# Altium PCB TIE2019_rezolvare.PcbDoc (part 2 of 2)
Units mm, origin at the board's own origin, x right, y up, seen from the top; angles counter-clockwise.
Board outline 267 x 129 mm, 8 copper layers (Signal 1, GND/Signal 2, GND 3, Signal 4, GND, Power/Signal 6, GND 7, Signal 8), stack 1.597 mm thick; 97 components, 82 nets, 657 pads, 352 vias.
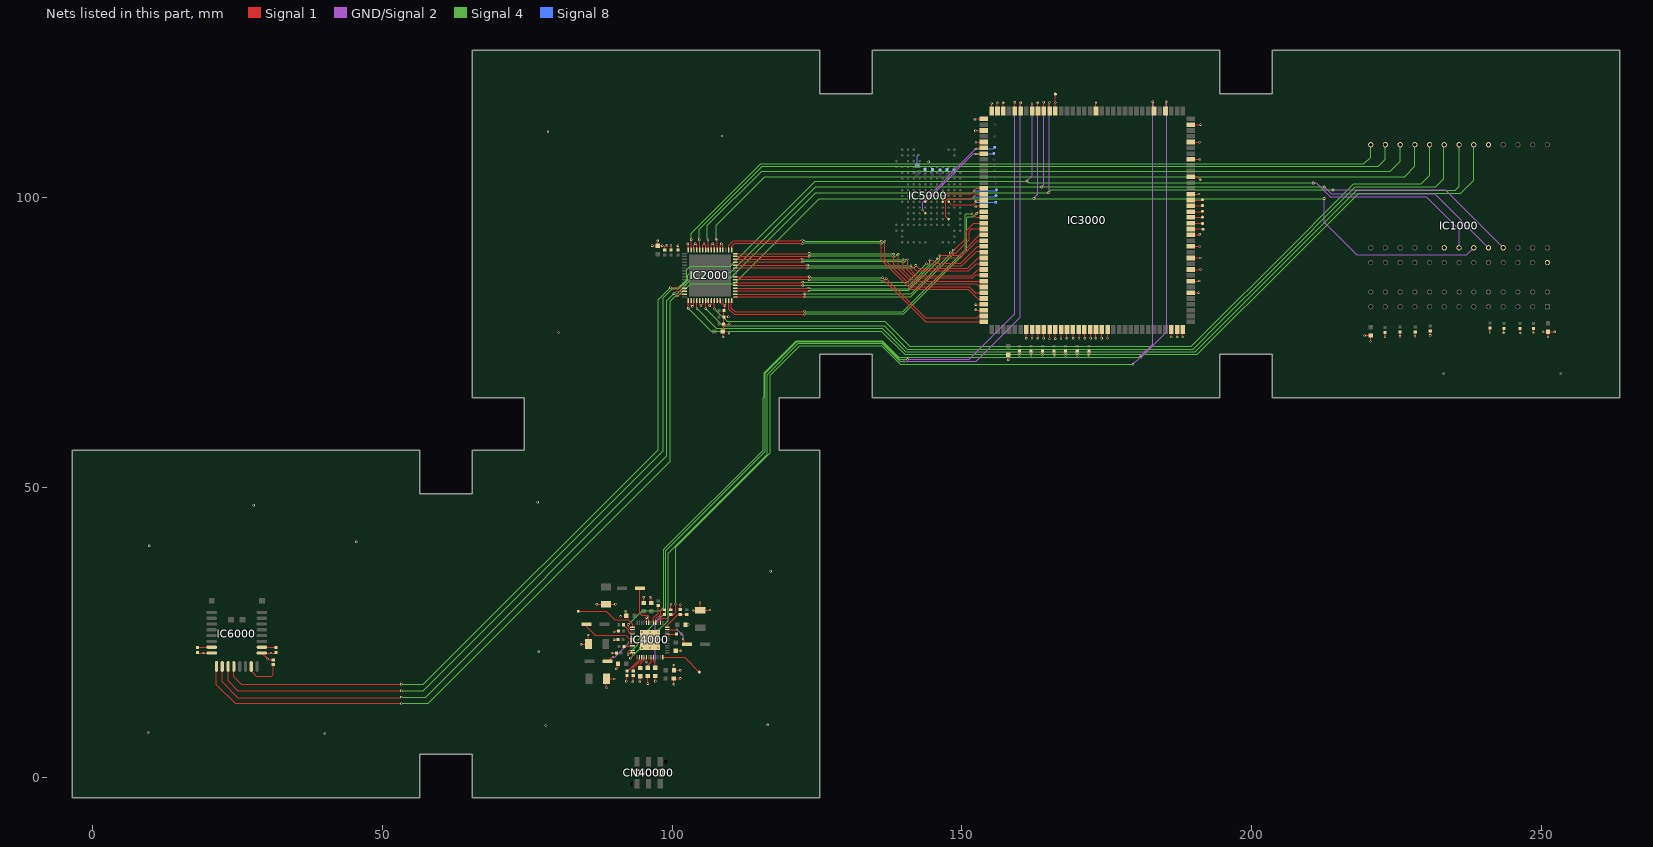
[diagram p8: the nets of this part, all layers, seen from the top]

## Via types
v1: diameter 0.4, hole 0.2, Signal 1 to Signal 8, 276 vias
v2: diameter 0.6, hole 0.3, Signal 1 to Signal 8, 49 vias
v3: diameter 0.325, hole 0.125, Signal 1 to GND/Signal 2, 9 vias
v4: diameter 0.5, hole 0.2, GND/Signal 2 to GND 7, 9 vias
v5: diameter 0.4, hole 0.2, Signal 1 to Signal 8, tented both sides, 9 vias

## Nets (pads, with @x,y where several pads share a name; then routed paths per layer and width w, separated by ;. In a path a pad name is that pad's centre, name@x,y a point inside that pad or via, vN(x,y) a via of type N, cw(c..) or ccw(c..) an arc to the next point about the centre after c; other vN are vias at no path point) (continued)
eMMC_DATA5: IC3000.83 IC5000.K8 TP_D5.1 | length 12.4
  Signal 1 w0.09: IC5000.K8@146.7,99.35 147.125,99.775 147.125,100.5 147.35,100.725 151.625,100.725 152.12,101.22 v1@152.123,101.223 ; v1(152.095,101.25) v1@152.123,101.223 ; IC3000.83@153.775,101.65 152.55,101.65 v1@152.123,101.223
  Signal 8 w0.09: v1(152.095,101.25) 152.095,101.244 155.778,101.244 TP_D5.1@155.931,101.397
eMMC_DATA6: IC3000.84 IC5000.N9 TP_D6.1 | length 14.2
  Signal 1 w0.09: IC5000.N9@147.7,96.35 147.25,96.8 147.25,99.55 147.525,99.825 151.65,99.825 152.475,100.65 IC3000.84@153.775,100.65
  Signal 8 w0.09: v1(152.07,100.254) 155.727,100.254 TP_D6.1@155.88,100.406
eMMC_DATA7: IC3000.85 IC5000.K9 TP_D7.1 | length 10.4
  Signal 1 w0.09: IC5000.K9@147.7,99.35 148.2,98.85 152.025,98.85 152.4,99.225 152.4,99.263 v1@152.493,99.357 ; v1(152.4,99.45) v1@152.493,99.357 ; IC3000.85@153.775,99.65 152.787,99.65 v1@152.493,99.357
  Signal 8 w0.09: v1(152.4,99.45) 152.4,99.263 TP_D7.1@155.829,99.263
eMMC_DS: IC3000.77 IC5000.K5 TP_DS.1 | length 16.6
  Signal 1 w0.09: IC5000.K5@143.7,99.35 v3(144.15,99.8) ; v1@152.35,107.6 152.4,107.65 IC3000.77@153.775,107.65
  GND/Signal 2 w0.09: v3(144.15,99.8) 151.95,107.6 v1@152.35,107.6
  Signal 8 w0.09: v1(152.4,107.594) 155.423,107.594 TP_DS.1@155.499,107.671
eMMC_RST: IC3000.76 IC5000.M5 TP_RST.1 | length 20
  Signal 1 w0.09: v3(143.2,97.9) 143.2,97.85 IC5000.M5@143.7,97.35 ; v1@152.4,108.5 152.55,108.65 IC3000.76@153.775,108.65
  GND/Signal 2 w0.09: v3(143.2,97.9) 143.2,99.3 v1@152.4,108.5
  Signal 8 w0.09: v1(152.4,108.458) 155.372,108.458 TP_RST.1@155.651,108.737
FRAME_CLK_N: IC2000.24 IC3000.106 | length 46.3
  Signal 1 w0.2: IC2000.24@110.899,86.415 110.934,86.38 110.954,86.4 123.33,86.4 123.43,86.5 123.65,86.5 v1(123.65,86.4) ; v1(136.3,86.235) 136.52,86.015 136.52,85.922 143.772,78.67 153.755,78.67 IC3000.106@153.775,78.65
  Signal 4 w0.09: v1(123.65,86.4) 123.675,86.375 123.847,86.375 123.987,86.235 v1(136.3,86.235)
FRAME_CLK_P: IC2000.23 IC3000.105 | length 46.1
  Signal 1 w0.2: IC2000.23@110.899,85.915 110.934,85.95 111.113,85.95 111.123,85.96 111.388,85.96 111.398,85.97 123.33,85.97 123.43,85.87 123.65,85.87 v1(123.65,85.9) ; v1(136.95,86.1) 143.7,79.35 152.625,79.35 152.925,79.65 IC3000.105@153.775,79.65
  Signal 4 w0.09: v1(123.65,85.9) 123.675,85.925 123.844,85.925 123.854,85.915 135.948,85.915 136.103,85.76 136.497,85.76 136.775,86.038 136.775,86.1 v1(136.95,86.1)
GND: C1001.1 C1002.1 C1003.1 C1004.1 C1005.1 C1101.1 C1102.1 C1103.1 C1104.1 C1105.1 C2001.1 C2002.1 C2003.1 C2004.1 C2101.1 C2102.1 C2103.1 C2104.1 C3000.2 C3001.2 C3002.2 C3003.2 C3004.2 C3005.2 C3006.2 C3007.2 C4001.1 C4002.1 C4003.1 C4004.2 C4005.2 C4006.1 C4007.1 C4008.1 C4009.1 C4010.2 C4011.1 C4012.2 C4013.1 C4014.2 C4015.1 C4016.2 C4017.1 C4019.1 C5001.2 C5002.2 C5003.2 C5004.1 C5005.1 C5006.1 C6001.1 C6002.1 C6003.1 CN40000.1 CN40000.3 IC1000.D1 IC1000.E8 IC1000.M5 IC2000.2 IC2000.3 IC2000.5 IC2000.6 IC2000.8 IC2000.9 IC2000.11 IC2000.12 IC2000.14 IC2000.36 IC2000.37 IC2000.39 IC2000.40 IC2000.42 IC2000.43 IC2000.45 IC2000.46 IC2000.48 IC3000.6 IC3000.8 IC3000.10 IC3000.12 IC3000.14 IC3000.16 IC3000.23 IC3000.26 IC3000.29 IC3000.32 IC3000.35 IC3000.52 IC3000.59 IC3000.68 IC3000.69 IC3000.70 IC3000.71 IC3000.73 IC3000.75 IC3000.86 IC3000.103 IC3000.104 IC3000.113 IC3000.114 IC3000.115 IC3000.116 IC3000.117 IC3000.118 IC3000.119 IC3000.120 IC3000.121 IC3000.122 IC3000.123 IC3000.124 IC3000.125 IC3000.126 IC3000.127 IC3000.138 IC3000.139 IC3000.140 IC4000.20 IC4000.41 IC4000.49 IC6000.8 IC6000.17 R4002.1 R4003.1 R4004.1 TH4000.1 TP3007.1 | length 154.5
  Signal 1 w0.1: C6003.1@18.3,21.58 18.38,21.5 v1(19.1,21.5) IC6000.8@20.575,21.5 ; C6002.1@31.2,20.32 30.38,20.32 v1(30.2,20.5) 29.225,21.475 IC6000.17@29.225,21.5 v1(30.8,21.5) 31.58,21.5 31.6,21.48 C6001.1@31.7,21.58 ; v1@84.4,23 84.45,23.05 C4013.1@85.575,23.05 v1@85.575,24.525 ; v1(87,29.9) C4017.1@88.6,29.9 v1@90.2,29.9 ; v1@88.675,15.525 C4011.1@88.675,17.05 v1@89.95,17.05 ; v1(89.647,21.5) C4009.1@90.38,21.5 ; v1@90,25.1 90.2,25.3 C4010.2@90.76,25.3 ; 90.2,23.8 C4012.2@90.86,23.8 ; v1(90.375,18.785) 90.675,19.085 C4002.1@90.675,19.65 ; C4019.1@91.96,27.8 C4019.1@92.06,27.9 v1@92.06,28.64 ; v1(92.109,16.619) 92.2,16.71 R4002.1@92.2,17.58 ; v1@93.3,16.5 R4003.1@93.3,17.59 ; v1@94.475,16.575 C4008.1@94.475,17.73 ; C4003.1@95.1,30.12 v1@95.1,31.1 ; v1(95.575,19.925) IC4000.41@95.575,20.75 ; IC4000.20@95.575,26.75 95.575,27.575 v1(95.6,27.6) ; v1@95.775,16.225 C4007.1@95.775,17.53 ; 95.775,16.425 v1@95.8,16.4 ; v1@96.2,31.1 96.4,30.9 C4016.2@96.4,30.12 ; v1(96.575,91.775) 96.61,91.74 C2001.1@97.525,91.74 ; v1@97.075,16.625 C4006.1@97.075,17.53 ; v1(97.5,92.6) 97.525,92.575 C2001.1@97.525,91.74 ; v1(98.325,91.775) 98.29,91.74 C2001.1@97.525,91.74 ; C2004.1@98.725,91.005 98.725,91.625 98.95,91.85 v1(99.1,91.85) ; R4004.1@99.775,28.96 v1@99.775,29.875 ; C2003.1@99.825,91.005 v1(99.825,91.85) ; v1@100.3,16.1 C4001.1@100.3,17.1 v1@101.4,17.1 ; v1@100.32,19.38 C4005.2@100.32,18.5 v1@101.4,18.5 ; C4004.2@100.6,21.88 v1@101.5,21.88 ; v1(101,91.775) 101.025,91.75 C2002.1@101.025,91.005 ; TH4000.1@101.4,29 v1@101.4,29.825 ; C4014.2@102.32,26.4 102.773,26.4 v1(102.773,26.419) ; v1(102.7,92.1) 102.774,92.026 IC2000.48@102.774,91.04 ; IC2000.2@103.274,82.29 103.274,81.526 v1(103.5,81.3) 103.774,81.574 IC2000.3@103.774,82.29 ; v1(103.627,28.819) 103.627,28.85 C4015.1@104.875,28.85 ; IC2000.46@103.774,91.04 103.774,91.874 v1(104,92.1) 104.274,91.826 IC2000.45@104.274,91.04 ; IC2000.5@104.774,82.29 104.774,81.626 v1(105,81.4) 105.274,81.674 IC2000.6@105.274,82.29 ; v1@104.875,30.125 C4015.1@104.875,28.85 ; IC2000.43@105.274,91.04 105.274,91.874 v1(105.5,92.1) 105.774,91.826 IC2000.42@105.774,91.04 ; IC2000.8@106.274,82.29 106.274,81.626 v1(106.5,81.4) 106.774,81.674 IC2000.9@106.774,82.29 ; v1@106.55,28.85 C4015.1@104.875,28.85 ; IC2000.40@106.774,91.04 106.774,91.874 v1(107,92.1) 107.274,91.826 IC2000.39@107.274,91.04 ; IC2000.11@107.774,82.29 IC2000.12@108.274,82.29 108.274,81.903 108.462,81.715 108.849,81.715 109.1,81.465 v1(109.1,81.4) ; IC2000.37@108.274,91.04 108.274,91.874 v1(108.5,92.1) 108.774,91.826 IC2000.36@108.774,91.04 ; v1(108.8,76) 108.8,76.895 C2101.1@108.72,76.975 ; IC2000.14@109.274,82.29 109.274,81.574 109.132,81.432 v1(109.1,81.4) ; v1(109.7,79.5) 109.675,79.475 C2103.1@108.92,79.475 ; v1(109.829,76.689) 109.543,76.975 C2101.1@108.72,76.975 ; v1(109.9,78.3) 109.857,78.257 C2102.1@108.901,78.257 ; v1@152.25,111.65 IC3000.73@153.775,111.65 ; v1@152.3,113.6 152.35,113.65 IC3000.71@153.775,113.65 ; v1(152.384,98.46) 152.574,98.65 IC3000.86@153.775,98.65 ; v1(152.4,80.7) 152.45,80.65 IC3000.104@153.775,80.65 ; v1(152.4,81.6) 153.725,81.6 IC3000.103@153.775,81.65 ; v1(152.424,109.605) 152.424,109.624 152.45,109.65 IC3000.75@153.775,109.65 ; IC3000.70@155.125,115 v1@155.125,116.275 ; v1@156.1,116.4 156.125,116.375 IC3000.69@156.125,115 ; IC3000.68@157.125,115 v1@157.125,116.375 ; v1(158,72.1) C3000.2@158,72.96 ; v1(159.9,72.845) C3001.2@159.9,73.58 ; v1(161.1,75.8) 161.125,75.825 IC3000.113@161.125,77.3 ; v1(161.9,72.845) C3002.2@161.9,73.58 ; v1(162.1,75.8) 162.125,75.825 IC3000.114@162.125,77.3 ; v1(163.1,75.8) 163.125,75.825 IC3000.115@163.125,77.3 ; v1(163.9,72.845) C3003.2@163.9,73.58 ; v1(164.1,75.8) 164.125,75.825 IC3000.116@164.125,77.3 ; v1(165.1,75.7) 165.125,75.725 IC3000.117@165.125,77.2 ; v1(165.9,72.845) C3004.2@165.9,73.58 ; v1(166.1,75.7) 166.125,75.725 IC3000.118@166.125,77.2 ; IC3000.59@166.125,115 166.125,117.925 TP3007.1@166.127,117.927 ; v1(167.1,75.7) 167.125,75.725 IC3000.119@167.125,77.2 ; v1(167.9,72.845) C3005.2@167.9,73.58 ; v1(168.1,75.8) 168.125,75.825 IC3000.120@168.125,77.3 ; v1(169.2,75.8) 169.225,75.825 IC3000.121@169.225,77.3 ; v1(169.9,72.845) C3006.2@169.9,73.58 ; v1(170.2,75.8) 170.225,75.825 IC3000.122@170.225,77.3 ; v1(171.2,75.8) 171.225,75.825 IC3000.123@171.225,77.3 ; v1(171.9,72.845) C3007.2@171.9,73.58 ; v1(172.2,75.8) 172.225,75.825 IC3000.124@172.225,77.3 ; v1(173.1,75.8) 173.125,75.825 IC3000.125@173.125,77.3 ; v1@173.1,116.4 173.125,116.375 IC3000.52@173.125,115 ; v1(174.1,75.8) 174.125,75.825 IC3000.126@174.125,77.3 ; v1(175.1,75.8) 175.125,75.825 IC3000.127@175.125,77.3 ; v1(186.124,76.005) 186.125,76.006 IC3000.138@186.125,77.3 ; v1(187.125,76.025) IC3000.139@187.125,77.3 ; v1(188.1,76) 188.125,76.025 IC3000.140@188.125,77.3 ; IC3000.6@189.475,83.65 v1@190.85,83.65 ; IC3000.8@189.475,85.65 191.05,85.65 v1@191.049,85.651 ; IC3000.10@189.475,87.65 191.25,87.65 v1@191.24,87.66 ; IC3000.12@189.475,89.65 v1@191.15,89.65 ; IC3000.14@189.475,91.65 v1@191.15,91.65 ; IC3000.16@189.475,93.65 v1@191.05,93.65 ; IC3000.23@189.475,100.65 190.85,100.65 v1(190.9,100.7) ; IC3000.26@189.475,103.65 190.55,103.65 191.075,103.125 v1(191.1,103.125) ; IC3000.29@189.475,106.65 v1(191.05,106.65) ; IC3000.32@189.475,109.65 190.95,109.65 v1(191,109.6) ; IC3000.35@189.475,112.65 v1(191.15,112.65) ; v1(219.475,76.275) 220.495,76.275 C1005.1@220.5,76.28 220.5,75.275 v1@220.475,75.25 ; v1(222.975,76.075) 223,76.1 C1004.1@223,76.78 ; C1003.1@225.6,76.88 225.6,76.04 v1@225.623,76.017 ; v1(228.175,76.15) 228.2,76.175 C1002.1@228.2,76.88 ; v1(230.8,76.3) C1001.1@230.8,77.06 ; v1(241.1,76.8) C1104.1@241.1,77.48 ; v1@243.483,76.713 v1(243.5,76.73) C1103.1@243.5,77.48 ; v1(246.3,76.7) C1102.1@246.3,77.48 ; v1(248.6,76.725) C1101.1@248.6,77.48 ; v1(250.235,76.935) C1105.1@251.118,76.935 ; v1(251.118,76.018) C1105.1@251.118,76.935 ; v1(252.265,76.935) C1105.1@251.118,76.935 ; C2101.1@108.72,76.975 108.901,77.156 C2102.1@108.901,78.257 ; C2102.1@108.901,78.257 108.92,78.277 C2103.1@108.92,79.475 ; C2103.1@108.92,79.475 108.92,80.655 108.9,80.675 109.042,80.817 109.042,81.342 v1(109.1,81.4)
  Signal 8 w0.09: C5001.2@142.3,105.59 142.3,107.2 v1(142.5,107.4)
  other v1: 40.1,7.6 9.6,7.8 78.2,9 116.5,9.1 88.677,15.516 100.309,16.119 95.809,16.219 93.209,16.519 94.409,16.519 97.109,16.619 90.009,17.019 101.409,17.119 101.409,18.519 100.309,19.419 77,21.7 101.509,21.899 84.309,23.019 90,23.8 85.509,24.619 90.009,25.119 91.109,27.819 92.009,28.719 106.538,28.928 101.434,29.869 90.209,29.919 99.809,29.919 104.809,30.219 95.109,31.119 96.209,31.119 117,35.6 9.8,40 45.5,40.7 27.8,47 76.8,47.5 220.5,75.25 225.575,76.125 80.4,76.8 190.815,83.668 190.96,85.687 191.163,87.695 191.127,89.635 191.027,91.635 191.027,93.735 144.25,106.25 108.6,110.7 78.6,111.4 152.324,111.605 152.224,113.605 155.124,116.305 156.124,116.405 157.107,116.408 173.124,116.405 166.149,116.468
  other v5: 94.775,22.35 96.175,22.35 97.575,22.35 94.775,23.75 96.175,23.75 97.575,23.75 94.775,25.15 96.175,25.15 97.575,25.15
IMGSEN_DATA0: IC1000.M6 IC2000.1 | length 159.6
  Signal 1 w0.1: IC2000.1@102.774,82.29 102.774,81.026 v1(102.8,81)
  Signal 4 w0.07: v1(102.8,81) 106.773,77.027 125.5,77.027 134.5,77.027 136.079,77.027 140.095,73.011 159.592,73.011 159.761,73.18 160.039,73.18 160.208,73.011 161.592,73.011 161.761,73.18 162.039,73.18 162.208,73.011 163.592,73.011 163.761,73.18 164.039,73.18 164.208,73.011 165.592,73.011 165.761,73.18 166.039,73.18 166.208,73.011 167.592,73.011 167.761,73.18 168.039,73.18 168.208,73.011 169.592,73.011 169.761,73.18 170.039,73.18 170.208,73.011 171.592,73.011 171.761,73.18 172.039,73.18 172.208,73.011 190.613,73.011 194.5,76.898 203.5,85.898 218.415,100.813 236.017,100.813 238.3,103.096 238.3,106.474 IC1000.M6@238.3,109.18
IMGSEN_DATA1: IC1000.M7 IC2000.4 | length 154.9
  Signal 1 w0.1: IC2000.4@104.274,82.29 104.274,80.926 v1(104.3,80.9)
  Signal 4 w0.07: v1(104.3,80.9) 107.64,77.56 125.5,77.56 134.5,77.56 136.232,77.56 140.298,73.494 190.257,73.494 194.5,77.736 203.5,86.736 218.135,101.371 235.077,101.371 235.76,102.054 235.76,105.159 IC1000.M7@235.76,109.18
IMGSEN_DATA2: IC1000.M8 IC2000.7 | length 149.7
  Signal 1 w0.1: IC2000.7@105.774,82.29 105.774,80.926 v1(105.8,80.9)
  Signal 4 w0.07: v1(105.8,80.9) 108.772,77.928 109.324,77.928 109.598,77.928 110.002,77.928 125.5,77.928 134.5,77.928 136.575,77.928 140.603,73.9 189.876,73.9 194.5,78.524 203.5,87.524 217.881,101.905 231.75,101.905 233.147,103.302 233.147,109.107 IC1000.M8@233.22,109.18
IMGSEN_DATA3: IC1000.M9 IC2000.10 | length 145.1
  Signal 1 w0.1: IC2000.10@107.274,82.29 107.274,80.926 v1(107.3,80.9)
  Signal 4 w0.07: v1(107.3,80.9) 109.5,78.7 109.904,78.7 110.3,78.7 125.5,78.7 134.5,78.7 136.692,78.7 141.009,74.383 189.572,74.383 194.5,79.311 203.5,88.311 217.602,102.413 229.26,102.413 230.734,103.886 230.734,109.126 IC1000.M9@230.68,109.18
IMGSEN_DATA4: IC1000.M10 IC2000.38 | length 132.8
  Signal 1 w0.1: v1(107.6,92.9) 107.774,92.726 IC2000.38@107.774,91.04
  Signal 4 w0.1: v1(107.6,92.9) 107.575,92.925 107.575,95.281 115.994,103.7 125.5,103.7 134.5,103.7 140.555,103.7 140.845,103.7 141.555,103.7 141.845,103.7 142.555,103.7 142.845,103.7 142.959,103.7 143.544,103.7 143.555,103.7 143.845,103.7 144.555,103.7 144.845,103.7 145.555,103.7 145.845,103.7 194.5,103.7 203.5,103.7 226.357,103.7 228.14,105.483 IC1000.M10@228.14,109.18
IMGSEN_DATA5: IC1000.M11 IC2000.41 | length 131.2
  Signal 1 w0.1: v1(106.2,92.8) 106.274,92.726 IC2000.41@106.274,91.04
  Signal 4 w0.1: v1(106.2,92.8) 106.1,92.9 106.1,95.254 115.496,104.65 125.5,104.65 134.5,104.65 142.505,104.65 142.555,104.7 142.845,104.7 142.895,104.65 194.5,104.65 203.5,104.65 223.878,104.65 225.6,106.372 IC1000.M11@225.6,109.18
IMGSEN_DATA6: IC1000.M12 IC2000.44 | length 129.5
  Signal 1 w0.1: v1(104.7,92.8) 104.774,92.726 IC2000.44@104.774,91.04
  Signal 4 w0.1: v1(104.7,92.8) 104.65,92.85 104.65,94.592 115.519,105.461 125.5,105.461 134.5,105.461 194.5,105.461 203.5,105.461 221.818,105.461 223.06,106.703 IC1000.M12@223.06,109.18
IMGSEN_DATA7: IC1000.M13 IC2000.47 | length 127.7
  Signal 1 w0.1: IC2000.47@103.274,91.04 103.274,91.799 103.289,91.814 103.28,91.822 103.28,92.78 v1(103.3,92.8)
  Signal 4 w0.1: v1(103.3,92.8) 103.28,92.82 103.28,93.882 115.298,105.9 125.5,105.9 134.5,105.9 144.105,105.9 144.395,105.9 194.5,105.9 203.5,105.9 219.356,105.9 220.52,107.064 IC1000.M13@220.52,109.18
LVDS_D0_N: IC2000.16 IC3000.88 | length 56
  Signal 1 w0.2: IC2000.16@110.274,82.29 110.239,82.255 110.239,81 110.864,80.375 122.505,80.375 122.605,80.475 122.825,80.475 v1(122.825,80.445) ; v1(151.725,97.27) 152.345,96.65 IC3000.88@153.775,96.65
  Signal 4 w0.09: v1(122.825,80.445) 122.915,80.355 139.8,80.355 150.55,91.105 150.55,97.083 150.737,97.27 v1(151.725,97.27)
LVDS_D0_P: IC2000.15 IC3000.87 | length 56.6
  Signal 1 w0.2: IC2000.15@109.774,82.29 109.809,82.255 109.809,80.822 110.686,79.945 122.505,79.945 122.605,79.845 122.825,79.845 v1(122.825,79.945) ; v1(152.55,97.375) 152.825,97.65 IC3000.87@153.775,97.65
  Signal 4 w0.09: v1(122.825,79.945) 122.915,80.035 139.933,80.035 150.8,90.902 150.8,96.6 150.97,96.77 151.945,96.77 v1(152.55,97.375)
LVDS_D1_N: IC2000.18 IC3000.90 | length 48.8
  Signal 1 w0.2: IC2000.18@110.899,83.415 110.934,83.38 110.979,83.425 122.58,83.425 122.68,83.525 122.9,83.525 v1(122.9,83.495) ; v1(148,90.557) 148.053,90.503 148.175,90.625 148.344,90.457 148.915,90.457 149.009,90.55 151.23,92.771 151.23,94.275 151.605,94.65 IC3000.90@153.775,94.65
  Signal 4 w0.09: v1(122.9,83.495) 125.5,83.495 134.5,83.495 141.23,83.495 148,90.265 148,90.45 v1(148,90.557)
LVDS_D1_P: IC2000.17 IC3000.89 | length 49.6
  Signal 1 w0.2: IC2000.17@110.899,82.915 110.934,82.95 111.113,82.95 111.123,82.96 111.388,82.96 111.423,82.995 122.58,82.995 122.68,82.895 122.9,82.895 v1(122.9,82.995) ; v1(148.525,91.025) 148.7,91.025 150.8,93.125 150.8,94.453 151.997,95.65 152.175,95.65 IC3000.89@153.775,95.65
  Signal 4 w0.09: v1(122.9,82.995) 125.5,82.995 134.5,82.995 141.182,82.995 148.475,90.288 148.475,90.647 148.311,90.811 v1(148.525,91.025)
LVDS_D2_N: IC2000.20 IC3000.92 | length 46.5
  Signal 1 w0.2: IC2000.20@110.899,84.415 110.934,84.38 110.979,84.425 123.33,84.425 123.396,84.491 123.575,84.491 v1(123.575,84.459) ; v1(145.727,89.493) 145.98,89.495 146.42,89.495 146.651,89.727 149.76,89.727 150.208,90.175 152.683,92.65 IC3000.92@153.775,92.65
  Signal 4 w0.09: v1(123.575,84.459) 123.598,84.436 123.812,84.436 123.878,84.37 125.5,84.37 134.5,84.37 140.725,84.37 145.775,89.42 145.775,89.446 v1(145.727,89.493)
LVDS_D2_P: IC2000.19 IC3000.91 | length 47.5
  Signal 1 w0.2: IC2000.19@110.899,83.915 110.934,83.95 111.113,83.95 111.123,83.96 111.388,83.96 111.423,83.995 123.255,83.995 123.355,83.895 123.615,83.895 v1(123.615,83.961) ; v1(146.2,90.025) 146.332,90.157 149.582,90.157 153.075,93.65 IC3000.91@153.775,93.65
  Signal 4 w0.09: v1(123.615,83.961) 123.704,84.05 140.858,84.05 145.826,89.018 145.924,89.018 146.202,89.297 146.202,89.69 146.2,89.692 v1(146.2,90.025)
LVDS_D3_N: IC2000.22 IC3000.94 | length 45.6
  Signal 1 w0.2: IC2000.22@110.899,85.415 110.934,85.38 110.954,85.4 122.205,85.4 122.305,85.5 122.525,85.5 v1(122.525,85.47) ; v1(143.875,88.65) 144.992,88.65 145.196,88.446 145.322,88.32 150.003,88.32 150.129,88.446 152.529,90.846 153.579,90.846 IC3000.94@153.775,90.65
  Signal 4 w0.09: v1(122.525,85.47) 140.695,85.47 v1(143.875,88.65)
LVDS_D3_P: IC2000.21 IC3000.93 | length 46.5
  Signal 1 w0.2: IC2000.21@110.899,84.915 110.934,84.95 111.113,84.95 111.123,84.96 111.388,84.96 111.398,84.97 122.205,84.97 122.305,84.87 122.525,84.87 v1(122.525,84.97) ; v1(144.472,89.217) 145.033,89.217 145.5,88.75 149.825,88.75 152.725,91.65 IC3000.93@153.775,91.65
  Signal 4 w0.09: v1(122.525,84.97) 125.5,84.97 134.5,84.97 140.87,84.97 144.45,88.55 v1@144.45,89.175
LVDS_D4_N: IC2000.28 IC3000.96 | length 43.9
  Signal 1 w0.2: IC2000.28@110.899,88.415 110.934,88.38 123.086,88.38 123.155,88.45 123.375,88.45 v1(123.375,88.42) ; v1(141.223,88.33) 142.133,87.42 151.203,87.42 152.433,88.65 IC3000.96@153.775,88.65
  Signal 4 w0.09: v1(123.375,88.42) 123.4,88.395 123.572,88.395 123.637,88.33 134.5,88.33 v1(141.223,88.33)
LVDS_D4_P: IC2000.27 IC3000.95 | length 44.3
  Signal 1 w0.2: IC2000.27@110.899,87.915 110.934,87.95 123.025,87.95 123.155,87.82 123.375,87.82 v1(123.375,87.92) ; v1(142.025,88.375) 142.55,87.85 151.025,87.85 152.825,89.65 IC3000.95@153.775,89.65
  Signal 4 w0.09: v1(123.375,87.92) 123.4,87.945 123.572,87.945 125.5,87.945 134.5,87.945 141.745,87.945 142.025,88.225 v1(142.025,88.375)
LVDS_D5_N: IC2000.30 IC3000.98 | length 45.2
  Signal 1 w0.2: IC2000.30@110.899,89.415 110.934,89.38 110.954,89.4 122.13,89.4 122.23,89.5 122.45,89.5 v1(122.45,89.47) ; v1(139.85,89.38) 139.85,88.317 141.846,86.321 141.972,86.195 151.853,86.195 151.979,86.321 152.404,86.746 153.679,86.746 IC3000.98@153.775,86.65
  Signal 4 w0.09: v1(122.45,89.47) 122.475,89.445 122.647,89.445 122.712,89.38 v1(139.85,89.38)
LVDS_D5_P: IC2000.29 IC3000.97 | length 45.8
  Signal 1 w0.2: IC2000.29@110.899,88.915 110.934,88.95 111.113,88.95 111.123,88.96 111.388,88.96 111.398,88.97 122.13,88.97 122.23,88.87 122.45,88.87 v1(122.45,88.97) ; v1(140.625,89.4) 140.625,88.15 142.15,86.625 151.675,86.625 152.7,87.65 IC3000.97@153.775,87.65
  Signal 4 w0.09: v1(122.45,88.97) 122.475,88.995 122.647,88.995 122.712,89.06 139.498,89.06 139.653,88.905 140.047,88.905 140.325,89.183 140.325,89.4 v1(140.625,89.4)
LVDS_D6_N: IC2000.32 IC3000.100 | length 46.4
  Signal 1 w0.2: IC2000.32@110.899,90.415 110.934,90.38 123.359,90.38 123.453,90.475 123.65,90.475 v1(123.65,90.444) ; v1(138.25,90.305) 138.25,88.542 141.617,85.175 152.475,85.175 152.825,84.825 153.6,84.825 IC3000.100@153.775,84.65
  Signal 4 w0.09: v1(123.65,90.444) 123.674,90.42 123.87,90.42 123.935,90.355 134.5,90.355 138.2,90.355 v1(138.25,90.305)
LVDS_D6_P: IC2000.31 IC3000.99 | length 46.5
  Signal 1 w0.2: IC2000.31@110.899,89.915 110.934,89.95 123.325,89.95 123.43,89.845 123.673,89.845 v1(123.673,89.945) ; v1(139.025,90.3) 139.025,88.375 141.75,85.65 IC3000.99@153.775,85.65
  Signal 4 w0.09: v1(123.673,89.945) 123.697,89.969 123.847,89.969 123.912,90.035 134.5,90.035 137.848,90.035 138.053,89.83 138.447,89.83 138.725,90.108 138.725,90.3 v1(139.025,90.3)
LVDS_D7_N: IC2000.34 IC3000.102 | length 51.2
  Signal 1 w0.2: IC2000.34@109.774,91.04 109.774,91.808 110.496,92.529 110.622,92.655 122.124,92.655 122.211,92.742 122.458,92.742 v1(122.5,92.7) ; v1(136.075,92.539) 136.075,89.367 141.172,84.27 151.08,84.27 152.7,82.65 IC3000.102@153.775,82.65
  Signal 4 w0.09: v1(122.5,92.7) 122.822,92.7 122.983,92.539 125.5,92.539 134.5,92.539 v1(136.075,92.539)
LVDS_D7_P: IC2000.33 IC3000.101 | length 50.4
  Signal 1 w0.2: IC2000.33@110.274,91.04 110.274,91.699 110.8,92.225 122.025,92.225 122.105,92.145 122.514,92.145 v1(122.526,92.158) ; v1(136.725,92.525) 136.725,89.325 141.35,84.7 151.258,84.7 152.308,83.65 IC3000.101@153.775,83.65
  Signal 4 w0.09: v1(122.526,92.158) 122.526,92.226 122.544,92.244 125.5,92.244 135.698,92.244 135.878,92.064 136.272,92.064 136.55,92.342 136.55,92.525 v1(136.725,92.525)
NetC4006_2: C4006.2 IC4000.44 R4005.2 | length 11
  Signal 1 w0.1: IC4000.44@96.775,20.75 96.775,20.125 97,19.9 v3(97.1,19.9) C4006.2@97.1,18.995 ; v3(97.9,27.6) 98.34,28.04 98.34,28.14 R4005.2@98.675,28.14
  GND/Signal 2 w0.1: v3(97.1,19.9) 97.1,26.8 v3(97.9,27.6)
NetC4007_2: C4007.2 IC4000.43 | length 1.8
  Signal 1 w0.1: C4007.2@95.775,19.17 95.8,19.195 95.8,19.4 96.375,19.975 IC4000.43@96.375,20.75
NetC4008_2: C4008.2 IC4000.40 | length 1.9
  Signal 1 w0.1: C4008.2@94.475,19.17 94.475,19.675 95.175,20.375 IC4000.40@95.175,20.75
NetC6001_2: C6001.2 IC6000.18 | length 2.7
  Signal 1 w0.1: IC6000.18@29.225,22.5 31.8,22.5 C6001.2@31.914,22.386
NetC6002_2: C6002.2 IC6000.15 | length 6.8
  Signal 1 w0.1: IC6000.15@27.4,19.175 27.4,18.4 28.3,17.5 30.9,17.5 31.2,17.8 C6002.2@31.2,19.48
NetC6003_2: C6003.2 IC6000.7 | length 2.3
  Signal 1 w0.1: C6003.2@18.3,22.42 18.38,22.5 IC6000.7@20.575,22.5
NetIC3000_17: IC3000.17 TP3000.1 | length 2.1
  Signal 1 w0.09: IC3000.17@189.475,94.65 191.55,94.65 TP3000.1@191.6,94.6
NetIC3000_18: IC3000.18 TP3001.1 | length 2
  Signal 1 w0.1: IC3000.18@189.475,95.65 191.45,95.65 TP3001.1@191.5,95.6
NetIC3000_19: IC3000.19 TP3002.1 | length 2.4
  Signal 1 w0.1: IC3000.19@189.475,96.65 191.65,96.65 191.7,96.7 TP3002.1@191.5,96.7
NetIC3000_20: IC3000.20 TP3003.1 | length 2
  Signal 1 w0.09: IC3000.20@189.475,97.65 191.45,97.65 TP3003.1@191.5,97.7
NetIC3000_21: IC3000.21 TP3004.1 | length 2
  Signal 1 w0.1: IC3000.21@189.475,98.65 191.45,98.65 TP3004.1@191.5,98.7
NetIC3000_22: IC3000.22 TP3005.1 | length 2
  Signal 1 w0.1: IC3000.22@189.475,99.65 191.45,99.65 TP3005.1@191.5,99.7
NetIC4000_11: IC4000.11 L4003.1 | length 4.9
  Signal 1 w0.1: IC4000.11@99.175,25.55 v3(100.85,25.55) ; v3(101.9,23.9) 101.9,23.65 L4003.1@102.55,23
  GND/Signal 2 w0.1: v3(100.85,25.55) 101.9,24.5 v3(101.9,23.9)
NetIC4000_12: IC4000.12 R4001.1 TH4000.2 | length 4.5
  Signal 1 w0.1: IC4000.12@99.175,25.95 99.175,26.275 101.08,28.18 TH4000.2@101.4,28.18 102.485,28.18 R4001.1@102.525,28.14
NetIC4000_16: IC4000.16 R4005.1 | length 3.1
  Signal 1 w0.1: IC4000.16@97.175,26.75 97.175,27.375 98,28.2 98,28.8 98.16,28.96 R4005.1@98.675,28.96
NetIC4000_19: IC4000.19 L4004.1 | length 7.2
  Signal 1 w0.1: L4004.1@94.45,32.7 94.45,28.35 94.75,28.05 95.75,28.05 95.8,28 96,27.8 96,26.775 IC4000.19@95.975,26.75
NetIC4000_25: IC4000.25 TP4010.1 | length 10.8
  Signal 1 w0.1: TP4010.1@83.8,28.7 88.6,28.7 90.1,27.2 92.4,27.2 93.175,26.425 IC4000.25@93.175,25.95
NetIC4000_30: IC4000.30 L4002.1 | length 9.2
  Signal 1 w0.1: L4002.1@85.25,26.5 85.25,26.05 86.7,24.6 91.955,24.6 92.105,24.45 92.15,24.45 92.65,23.95 IC4000.30@93.175,23.95
NetIC4000_31: IC4000.31 L4000.1 | length 5.9
  Signal 1 w0.1: L4000.1@88.825,20.05 89.575,20.8 v3(89.8,20.8) ; v3(92.4,23.1) 92.4,23.3 92.65,23.55 IC4000.31@93.175,23.55
  GND/Signal 2 w0.1: v3(89.8,20.8) 90.1,20.8 v3(92.4,23.1)
NetIC4000_38: IC4000.38 R4002.2 | length 3.4
  Signal 1 w0.1: R4002.2@92.2,18.4 92.4,18.4 94.375,20.375 IC4000.38@94.375,20.75
NetIC4000_39: IC4000.39 R4003.2 | length 3
  Signal 1 w0.1: R4003.2@93.3,18.41 93.3,18.957 93.95,19.607 94.038,19.695 94.095,19.695 94.775,20.375 IC4000.39@94.775,20.75
NetIC4000_48: IC4000.48 TP4011.1 | length 7.4
  Signal 1 w0.1: IC4000.48@98.375,20.75 102.15,20.75 TP4011.1@104.7,18.2
PMIC_CLK: IC3000.42 IC4000.14 R4004.2 | length 165.8
  Signal 1 w0.1: IC4000.14@97.975,26.75 97.975,27.175 98.3,27.5 99.135,27.5 R4004.2@99.775,28.14 100.24,28.14 100.6,28.5 v1(100.6,29.9) ; v1(182.924,116.605) 183.125,116.404 IC3000.42@183.125,115
  GND/Signal 2 w0.1: v1(179.5,71.3) 180.553,72.353 180.55,72.355 180.55,72.645 180.755,72.85 180.974,72.85 182.9,74.776 v1@182.9,116.6
  Signal 4 w0.1: v1(100.6,29.9) 100.6,39.724 116.9,56.024 116.9,69.4 122,74.5 136.2,74.5 139.4,71.3 v1(179.5,71.3)
PMIC_I1C_SCL: IC3000.66 IC4000.35 | length 147.6
  Signal 1 w0.09: v1(92.4,21.2) 92.4,21.716 92.5,21.816 92.63,21.946 92.946,21.946 92.95,21.95 IC4000.35@93.175,21.95 ; v1(159.124,116.505) IC3000.66@159.125,115 IC3000.66@159.125,115
  GND/Signal 2 w0.09: v1(140.6,72.155) 140.6,72.2 151.3,72.2 159.1,80 v1@159.1,116.5
  Signal 4 w0.09: v1(92.4,21.2) 94.2,23 94.2,23.8 98.9,28.5 98.9,39.1 116.1,56.3 116.1,56.5 116.1,65.5 116.1,69.8 121.5,75.2 125.5,75.2 134.5,75.2 135.6,75.2 135.9,75.2 136.169,75.2 139.169,72.2 140.6,72.2 v1(140.6,72.155)
PMIC_I1C_SDA: IC3000.65 IC4000.36 | length 149
  Signal 1 w0.09: v1(92.8,20.6) 93.175,20.975 IC4000.36@93.175,21.55 ; v1(160.124,116.405) IC3000.65@160.125,115 IC3000.65@160.125,115
  GND/Signal 2 w0.09: v1(140,71.8) 152.5,71.8 160.1,79.4 v1@160.1,116.4
  Signal 4 w0.09: v1(92.8,20.6) 94.43,22.23 94.43,22.493 94.632,22.695 94.895,22.695 95.83,23.63 95.83,23.893 96.032,24.095 96.295,24.095 97.23,25.03 97.23,25.293 97.432,25.495 97.695,25.495 99.3,27.1 99.3,38.7 116.4,55.8 116.4,69.5 121.8,74.9 125.5,74.9 134.5,74.9 136.2,74.9 139.3,71.8 v1(140,71.8)
PMIC_INT: IC3000.40 IC4000.26 | length 172.5
  Signal 1 w0.09: v1@92.4,26.381 92.4,26 92.85,25.55 IC4000.26@93.175,25.55 ; IC3000.40@185.125,115 185.125,116.506 v1(185.224,116.605)
  GND/Signal 2 w0.09: v1(180.9,72.5) 185.3,76.9 185.3,116.5 v1@185.2,116.6
  Signal 4 w0.09: v1(92.424,26.405) 94.819,28.8 98,28.8 98.6,29.4 98.6,39.4 115.7,56.5 115.7,65.5 115.91,65.71 115.91,69.879 121.421,75.39 136.11,75.39 136.247,75.39 139.137,72.5 v1(180.9,72.5)
SMPS1_FDBK: IC4000.33 R4006.1 | length 1.6
  Signal 1 w0.1: R4006.1@91.695,22.65 92.35,22.65 92.65,22.65 92.8,22.8 93.125,22.8 IC4000.33@93.175,22.75
SMPS2_FDBK: IC4000.28 R4007.1 | length 2.5
  Signal 1 w0.1: R4007.1@91.615,26.385 92.45,25.55 92.45,25.25 92.625,25.075 92.625,24.988 92.713,24.9 92.8,24.9 92.95,24.75 IC4000.28@93.175,24.75
SMPS3_FDBK: IC4000.9 R4008.1 | length 1.6
  Signal 1 w0.1: IC4000.9@99.175,24.75 R4008.1@100.785,24.75
SMPS4_FDBK: IC4000.17 R4009.1 | length 3.3
  Signal 1 w0.1: IC4000.17@96.775,26.75 96.775,27.575 97.6,28.4 R4009.1@97.6,29.69
SPI1_CLK: IC1000.E6 IC2000.63 IC3000.62 IC6000.9 | length 300.1
  Signal 1 w0.1: IC6000.9@21.4,19.175 21.4,16 24.6,12.8 v1(53.3,12.8) ; v1(100.9,83.1) 101.215,83.415 IC2000.63@102.149,83.415 ; v1(163.1,116.4) 163.1,115.025 IC3000.62@163.125,115
  GND/Signal 2 w0.1: v4(162.4,99.9) 163.1,100.6 v1(163.1,116.4) ; v4(212.5,99.9) 212.5,95.8 218.1,90.2 237.1,90.2 IC1000.E6@238.3,91.4
  Signal 4 w0.1: v1(53.3,12.8) 57.9,12.8 99.7,54.6 99.7,82.2 100.6,83.1 v1(100.9,83.1) 101.1,83.1 103.2,85.2 110.7,85.2 125.4,99.9 v4(162.4,99.9) v4(212.5,99.9)
SPI1_CS: IC1000.E7 IC2000.61 IC3000.63 IC6000.12 | length 289.8
  Signal 1 w0.1: IC6000.12@24.4,19.175 24.4,17.4 25.7,16.1 v1(53.3,16.1) ; v1(99.7,84.5) 102.065,84.5 IC2000.61@102.149,84.415 ; v1(162.1,116.3) 162.1,115.025 IC3000.63@162.125,115
  GND/Signal 2 w0.1: v4(161.202,102.931) 162.1,103.828 v1(162.1,116.3) ; v4(210.6,102.6) 211.1,102.6 213.5,100.2 230.1,100.2 235.76,94.54 IC1000.E7@235.76,91.4
  Signal 4 w0.1: v1(53.3,16.1) 57.1,16.1 97.6,56.6 97.6,82.4 v1(99.7,84.5) 101.1,84.5 102.5,85.9 102.5,87.6 103.1,88.2 110,88.2 124.701,102.901 v4@161.121,102.901 ; v4(161.202,102.931) 161.533,102.6 v4(210.6,102.6)
SPI1_MISO: IC1000.E4 IC2000.62 IC3000.60 IC6000.10 | length 300.3
  Signal 1 w0.1: IC6000.10@22.4,19.175 22.4,16.5 25.1,13.8 53.2,13.8 v1(53.3,13.9) ; v1(100.3,83.5) 100.715,83.915 IC2000.62@102.149,83.915 ; v1(165.1,116.5) 165.1,115.025 IC3000.60@165.125,115
  GND/Signal 2 w0.1: v4(164.9,100.9) 165.1,101.1 v1(165.1,116.5) ; v4(214,101.4) 233.38,101.4 IC1000.E4@243.38,91.4
  Signal 4 w0.1: v1(53.3,13.9) 57.5,13.9 99.1,55.5 99.1,82.3 v1(100.3,83.5) 100.9,83.5 103,85.6 103,86 103.2,86.2 110.1,86.2 124.8,100.9 v4(164.9,100.9) 165.4,101.4 v4(214,101.4)
SPI1_MOSI: IC1000.E5 IC3000.61 IC6000.11 | length 293.2
  Signal 1 w0.1: IC6000.11@23.4,19.175 23.4,16.7 25.1,15 v1(53.3,15) ; v1(164.1,116.5) 164.1,115.025 IC3000.61@164.125,115
  GND/Signal 2 w0.1: v4(163.7,101.9) 164.1,102.3 v1(164.1,116.5) ; v4(212.5,101.9) 213.7,100.7 231.54,100.7 IC1000.E5@240.84,91.4
  Signal 4 w0.1: v1(53.3,15) 57.1,15 98.5,56.4 98.5,82.8 100,84.3 101.183,84.3 102.7,85.817 102.7,86.7 103.2,87.2 110.1,87.2 124.8,101.9 v4(163.7,101.9) v4(212.5,101.9)
pads on no net: CN40000. IC1000.B1 IC1000.B2 IC1000.B3 IC1000.B4 IC1000.B5 IC1000.B6 IC1000.B7 IC1000.B8 IC1000.B9 IC1000.B10 IC1000.B11 IC1000.B12 IC1000.B13 IC1000.D4 IC1000.D5 IC1000.D6 IC1000.D8 IC1000.D10 IC1000.D12 IC1000.E1 IC1000.E2 IC1000.E3 IC1000.E9 IC1000.E10 IC1000.E11 IC1000.E12 IC1000.E13 IC1000.M1 IC1000.M2 IC1000.M3 IC1000.M4 IC2000. IC2000.13 IC2000.49 IC2000.51 IC2000.52 IC2000.53 IC2000.54 IC2000.55 IC2000.56 IC3000.1 IC3000.2 IC3000.3 IC3000.4 IC3000.5 IC3000.24 IC3000.25 IC3000.27 IC3000.28 IC3000.30 IC3000.31 IC3000.36 IC3000.43 IC3000.44 IC3000.45 IC3000.46 IC3000.47 IC3000.48 IC3000.49 IC3000.50 IC3000.51 IC3000.53 IC3000.54 IC3000.55 IC3000.56 IC3000.57 IC3000.58 IC3000.64 IC3000.67 IC3000.128 IC3000.129 IC3000.130 IC3000.131 IC3000.132 IC3000.133 IC3000.134 IC3000.135 IC3000.136 IC3000.137 IC4000.1 IC4000.2 IC4000.3 IC4000.4 IC4000.5 IC4000.6 IC4000.7 IC4000.13 IC4000.15 IC4000.21 IC4000.24 IC4000.27 IC4000.45 IC4000.47 IC5000.A1 IC5000.A2 IC5000.A3 IC5000.A9 IC5000.A10 IC5000.B1 IC5000.B2 IC5000.B3 IC5000.B10 IC5000.C0 IC5000.C2 IC5000.C3 IC5000.C4 IC5000.D0 IC5000.D1 IC5000.D2 IC5000.D3 IC5000.D4 IC5000.D5 IC5000.D6 IC5000.D7 IC5000.D8 IC5000.D9 IC5000.D10 IC5000.E1 IC5000.E2 IC5000.E3 IC5000.E5 IC5000.E6 IC5000.E7 IC5000.E8 IC5000.E9 IC5000.E10 IC5000.E11 IC5000.F1 IC5000.F10 IC5000.F11 IC5000.G2 IC5000.G3 IC5000.G4 IC5000.G5 IC5000.G6 IC5000.G7 IC5000.G8 IC5000.G9 IC5000.G10 IC5000.G11 IC5000.H1 IC5000.H2 IC5000.H4 IC5000.H5 IC5000.H6 IC5000.H7 IC5000.H9 IC5000.H10 IC5000.H11 IC5000.J1 IC5000.J2 IC5000.J3 IC5000.J4 IC5000.J5 IC5000.J6 IC5000.J7 IC5000.J8 IC5000.J9 IC5000.J10 IC5000.J11 IC5000.K1 IC5000.K4 IC5000.K6 IC5000.K7 IC5000.K10 IC5000.K11 IC5000.L3 IC5000.L5 IC5000.L6 IC5000.L8 IC5000.L10 IC5000.L11 IC5000.M2 IC5000.M3 IC5000.M4 IC5000.M6 IC5000.M7 IC5000.M8 IC5000.M9 IC5000.M11 IC5000.N4 IC5000.N5 IC5000.N6 IC5000.N7 IC5000.N11 IC5000.P0 IC5000.P1 IC5000.P2 IC5000.P4 IC5000.P7 IC5000.P9 IC5000.P11 IC5000.R0 IC5000.R1 IC5000.R10 IC5000.R11 IC5000.T1 IC5000.T10 IC5000.U1 IC5000.U2 IC5000.U3 IC5000.U4 IC5000.U5 IC5000.U8 IC5000.U9 IC5000.U10 IC6000.1 IC6000.2 IC6000.3 IC6000.4 IC6000.5 IC6000.6 IC6000.13 IC6000.14 IC6000.16 IC6000.19 IC6000.20 IC6000.21 IC6000.22 IC6000.23 IC6000.24 IC6000.MP1 IC6000.MP2 IC6000.MP3 IC6000.MP4
copper on no net:
  other v2: 103.524,83.665 104.524,83.665 105.524,83.665 106.524,83.665 107.524,83.665 108.524,83.665 109.524,83.665 103.524,84.665 104.524,84.665 105.524,84.665 106.524,84.665 107.524,84.665 108.524,84.665 109.524,84.665 103.524,85.665 104.524,85.665 105.524,85.665 106.524,85.665 107.524,85.665 108.524,85.665 109.524,85.665 103.524,86.665 104.524,86.665 105.524,86.665 106.524,86.665 107.524,86.665 108.524,86.665 109.524,86.665 103.524,87.665 104.524,87.665 105.524,87.665 106.524,87.665 107.524,87.665 108.524,87.665 109.524,87.665 103.524,88.665 104.524,88.665 105.524,88.665 106.524,88.665 107.524,88.665 108.524,88.665 109.524,88.665 103.524,89.665 104.524,89.665 105.524,89.665 106.524,89.665 107.524,89.665 108.524,89.665 109.524,89.665

## Polygon pours and split planes (outlines as drawn)
GND on Signal 8 "GND_L08_P001" (solid, remove dead copper, pour order 1): 141.5,106.85 141.5,104.725 149.3,104.725 149.575,105 149.4,105.175 149.4,106.85
+V_SMPS_3V3 on Signal 8 "+V_SMPS_3V3_L08_P000" (solid, remove dead copper, pour order 0): 140.4,104.5 149.2,104.5 149.2,101 140.4,101
+V_SMPS_3V3 on Signal 1 "+V_SMPS_3V3_L01_P004" (solid, remove dead copper, pour order 4): 96.925,90.675 101.525,90.675 101.525,90.2 102.712,90.2 102.712,89.575 96.925,89.575
+V_IN on Power/Signal 6 "+V_IN_L06_P006" (solid, remove dead copper, pour order 6): 86.5,32.1 103.2,32.1 103.2,14.8 99.6,11.2 97,11.2 96.9,11.1 96.9,-0.1 95,-0.1 94.9,-0.2 94.9,10.9 94.5,11.3 89,11.3 86.5,13.8
+V_SMPS_1V8 on Power/Signal 6 "+V_SMPS_1V8_L06_P008" (solid, remove dead copper, pour order 8): 234.8,81.975 254.075,81.975 254.075,73 234.8,73
+V_SMPS_3V3 on Power/Signal 6 "+V_SMPS_3V3_L06_P003" (solid, remove dead copper, pour order 3): 215.1,81.975 234.375,81.975 234.375,73 215.1,73
no net on Layer0 "Default Coverlay 2 Top" (split plane): 203.5,73 194.5,73 194.5,118 203.5,118
no net on Layer0 "Default Coverlay 2 Top" (split plane): 118.5,65.5 118.5,56.5 74.5,56.5 74.5,65.5
no net on Layer0 "Default Coverlay 2 Top" (split plane): 134.5,73 125.5,73 125.5,118 134.5,118
no net on Layer0 "Default Coverlay 2 Top" (split plane): 65.5,4 56.5,4 56.5,49 65.5,49
no net on Layer0 "Default Coverlay 2 Bottom" (split plane): 203.5,73 194.5,73 194.5,118 203.5,118
no net on Layer0 "Default Coverlay 2 Bottom" (split plane): 118.5,65.5 118.5,56.5 74.5,56.5 74.5,65.5
no net on Layer0 "Default Coverlay 2 Bottom" (split plane): 134.5,73 125.5,73 125.5,118 134.5,118
no net on Layer0 "Default Coverlay 2 Bottom" (split plane): 65.5,4 56.5,4 56.5,49 65.5,49
GND on GND (split plane): 165 vertices, not listed, extent -2.99,-2.99 262.99,124.99
GND on GND 7 (split plane): 117.999,56.4 118.028,56.305 118.076,56.216 118.139,56.139 118.216,56.076 118.305,56.028 118.4,55.999 118.5,55.99 124.99,55.99 124.99,-2.99 66.01,-2.99 66.01,4 66.001,4.1 65.972,4.195 65.924,4.284 65.861,4.361 65.784,4.424 65.695,4.472 65.6,4.501 65.5,4.51 65.5,48.49 65.6,48.499 65.695,48.528 65.784,48.576 65.861,48.639 65.924,48.716 65.972,48.805 66.001,48.9 66.01,49 66.01,55.99 74.5,55.99 74.6,55.999 74.695,56.028 74.784,56.076 74.861,56.139 74.924,56.216 74.972,56.305 75.001,56.4 75.01,56.5 117.99,56.5
GND on GND 7 (split plane): 55.99,49 55.999,48.9 56.028,48.805 56.076,48.716 56.139,48.639 56.216,48.576 56.305,48.528 56.4,48.499 56.5,48.49 56.5,4.51 56.4,4.501 56.305,4.472 56.216,4.424 56.139,4.361 56.076,4.284 56.028,4.195 55.999,4.1 55.99,4 55.99,-2.99 -2.99,-2.99 -2.99,55.99 55.99,55.99
GND on GND 7 (split plane): 124.99,118 124.999,117.9 125.028,117.805 125.076,117.716 125.139,117.639 125.216,117.576 125.305,117.528 125.4,117.499 125.5,117.49 125.5,73.51 125.4,73.501 125.305,73.472 125.216,73.424 125.139,73.361 125.076,73.284 125.028,73.195 124.999,73.1 124.99,73 124.99,66.01 118.5,66.01 118.4,66.001 118.305,65.972 118.216,65.924 118.139,65.861 118.076,65.784 118.028,65.695 117.999,65.6 117.99,65.5 75.01,65.5 75.001,65.6 74.972,65.695 74.924,65.784 74.861,65.861 74.784,65.924 74.695,65.972 74.6,66.001 74.5,66.01 66.01,66.01 66.01,124.99 124.99,124.99
GND on GND 7 (split plane): 193.99,118 193.999,117.9 194.028,117.805 194.076,117.716 194.139,117.639 194.216,117.576 194.305,117.528 194.4,117.499 194.5,117.49 194.5,73.51 194.4,73.501 194.305,73.472 194.216,73.424 194.139,73.361 194.076,73.284 194.028,73.195 193.999,73.1 193.99,73 193.99,66.01 135.01,66.01 135.01,73 135.001,73.1 134.972,73.195 134.924,73.284 134.861,73.361 134.784,73.424 134.695,73.472 134.6,73.501 134.5,73.51 134.5,117.49 134.6,117.499 134.695,117.528 134.784,117.576 134.861,117.639 134.924,117.716 134.972,117.805 135.001,117.9 135.01,118 135.01,124.99 193.99,124.99
GND on GND 7 (split plane): 262.99,66.01 204.01,66.01 204.01,73 204.001,73.1 203.972,73.195 203.924,73.284 203.861,73.361 203.784,73.424 203.695,73.472 203.6,73.501 203.5,73.51 203.5,117.49 203.6,117.499 203.695,117.528 203.784,117.576 203.861,117.639 203.924,117.716 203.972,117.805 204.001,117.9 204.01,118 204.01,124.99 262.99,124.99
GND on GND 3 (split plane): 165 vertices, not listed, extent -2.99,-2.99 262.99,124.99

## Keep-outs
Keep-Out Layer:
  rectangle: 193.5,74 204.5,117
  rectangle: 55.5,4.5 66.5,48
  rectangle: 124.5,74 135.5,117
  rectangle: 75.5,55.5 117.5,66.5
  lines w0.254: -2.5,-2.5 -2.5,55.5 55.5,55.5 55.5,48 66.5,48 66.5,55.5 75.5,55.5 75.5,66.5 66.5,66.5 66.5,124.5 124.5,124.5 124.5,117 135.5,117 135.5,124.5 193.5,124.5 193.5,117 204.5,117 204.5,124.5 262.5,124.5 262.5,66.5 204.5,66.5 204.5,74 193.5,74 193.5,66.5 135.5,66.5 135.5,74 124.5,74 124.5,66.5 117.5,66.5 117.5,55.5 124.5,55.5 124.5,-2.5 66.5,-2.5 66.5,4.5 55.5,4.5 55.5,-2.5 -2.5,-2.5

## Silkscreen, mask and mechanical layers (free items; w line width, h text height)
Mechanical 2:
  circle w0.254: c260,69 r1.75
  circle w0.254: c207,69 r1.75
  circle w0.254: c260,122 r1.75
  circle w0.254: c207,122 r1.75
  circle w0.254: c191,69 r1.75
  circle w0.254: c191,122 r1.75
  circle w0.254: c138,69 r1.75
  circle w0.254: c138,122 r1.75
  circle w0.254: c122,122 r1.75
  circle w0.254: c69,122 r1.75
  circle w0.254: c122,69 r1.75
  circle w0.254: c69,69 r1.75
  circle w0.254: c122,53 r1.75
  circle w0.254: c69,53 r1.75
  circle w0.254: c53,53 r1.75
  circle w0.254: c0,53 r1.75
  circle w0.254: c122,0 r1.75
  circle w0.254: c69,0 r1.75
  circle w0.254: c53,0 r1.75
  circle w0.254: c0,0 r1.75